# Altium PCB BOB_PAC5527.PcbDoc (part 1 of 3)
Units mm, origin at the board's own origin, x right, y up, seen from the top; angles counter-clockwise.
Board outline 40 x 40 mm, 2 copper layers (Top Layer, Bottom Layer), stack 1.448 mm thick; 84 components, 61 nets, 272 pads, 317 vias.
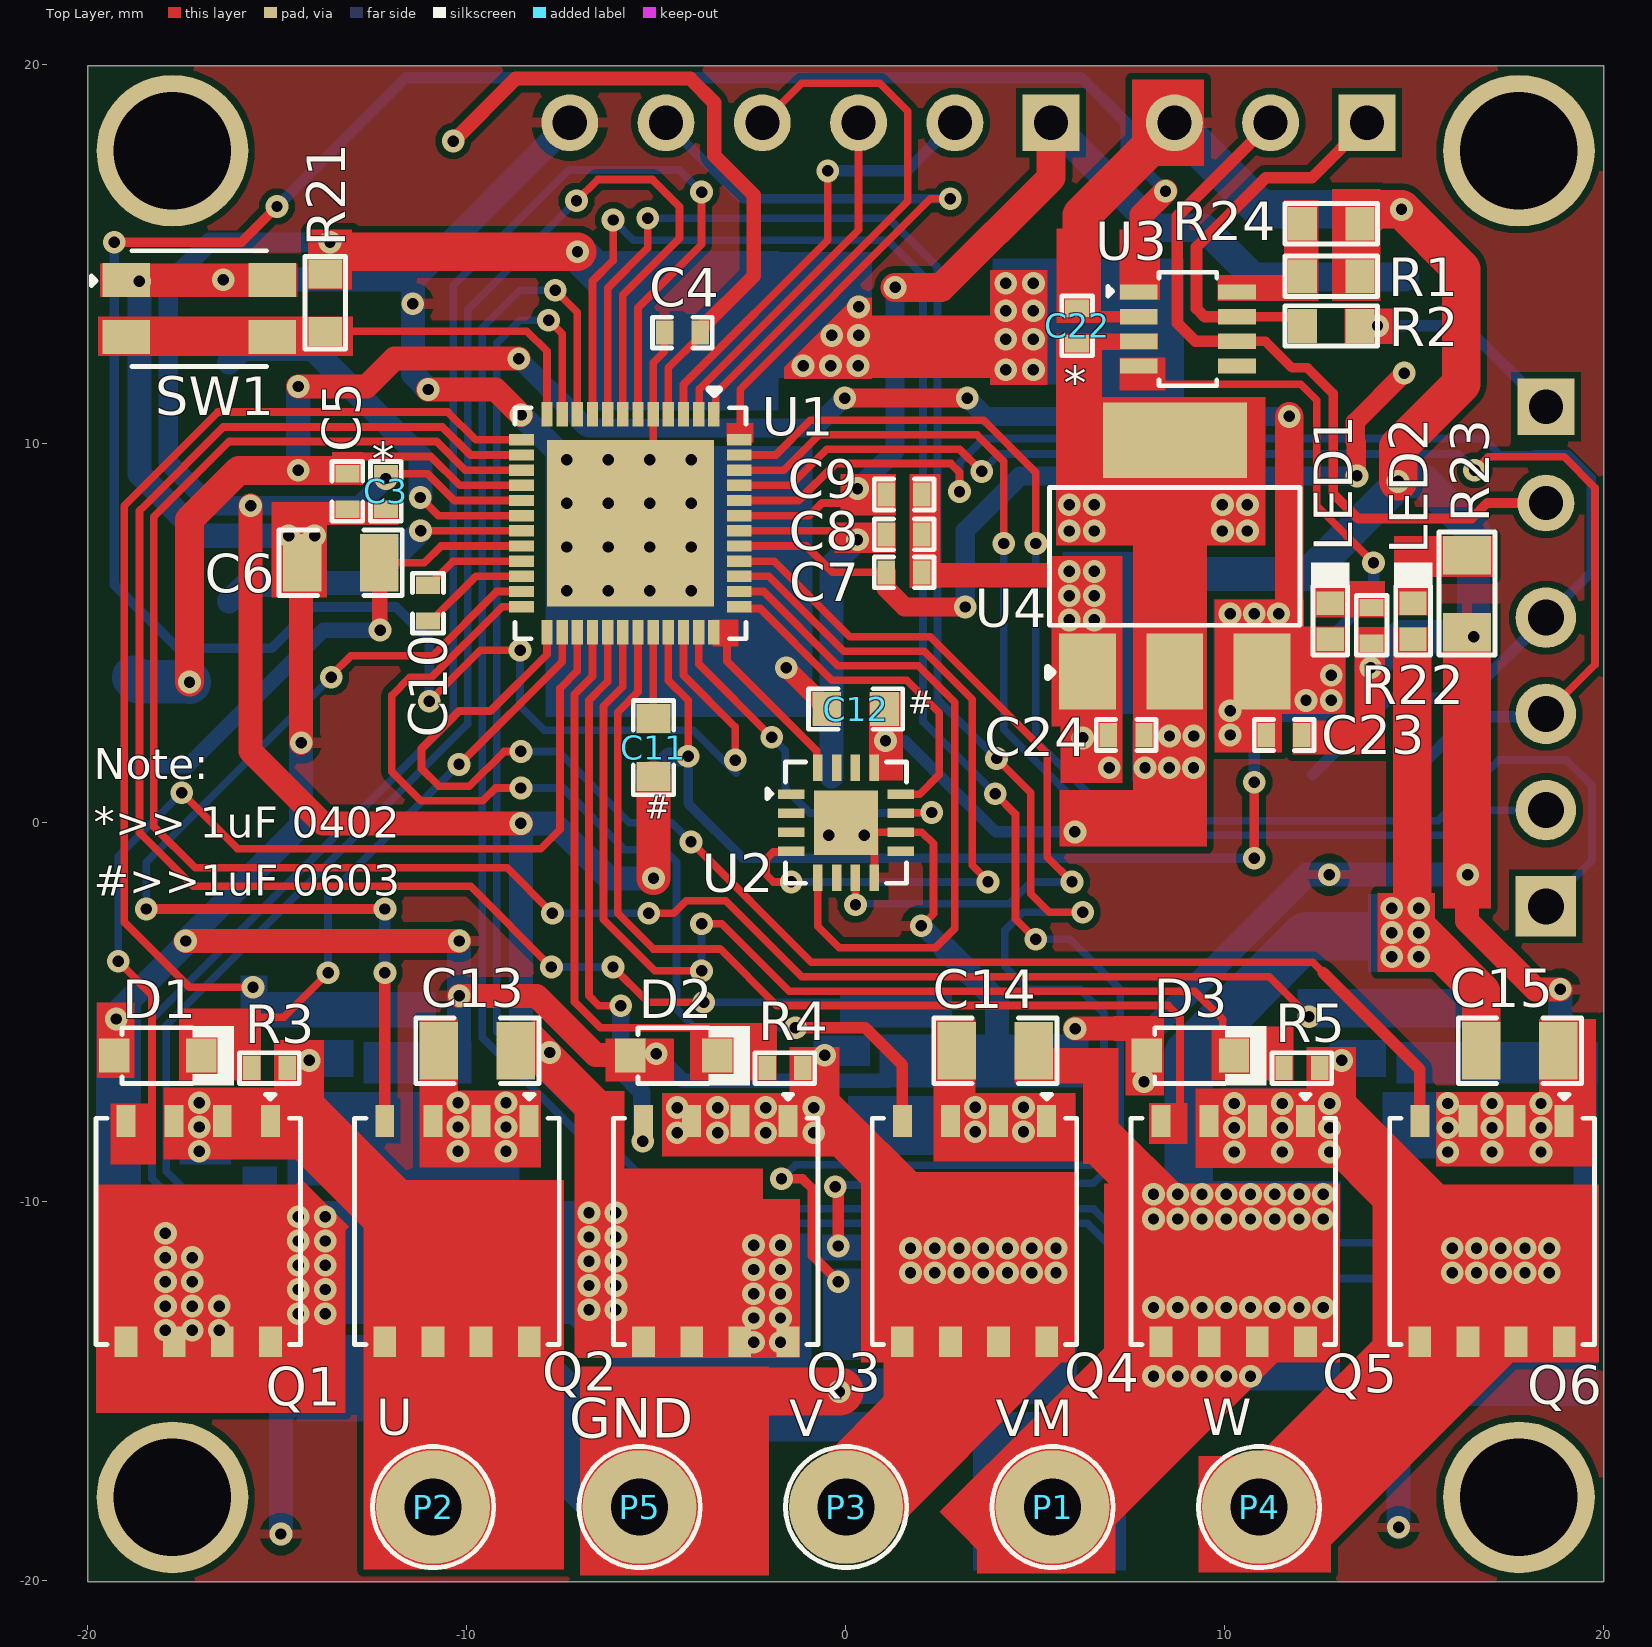
[diagram p0: Top Layer view]
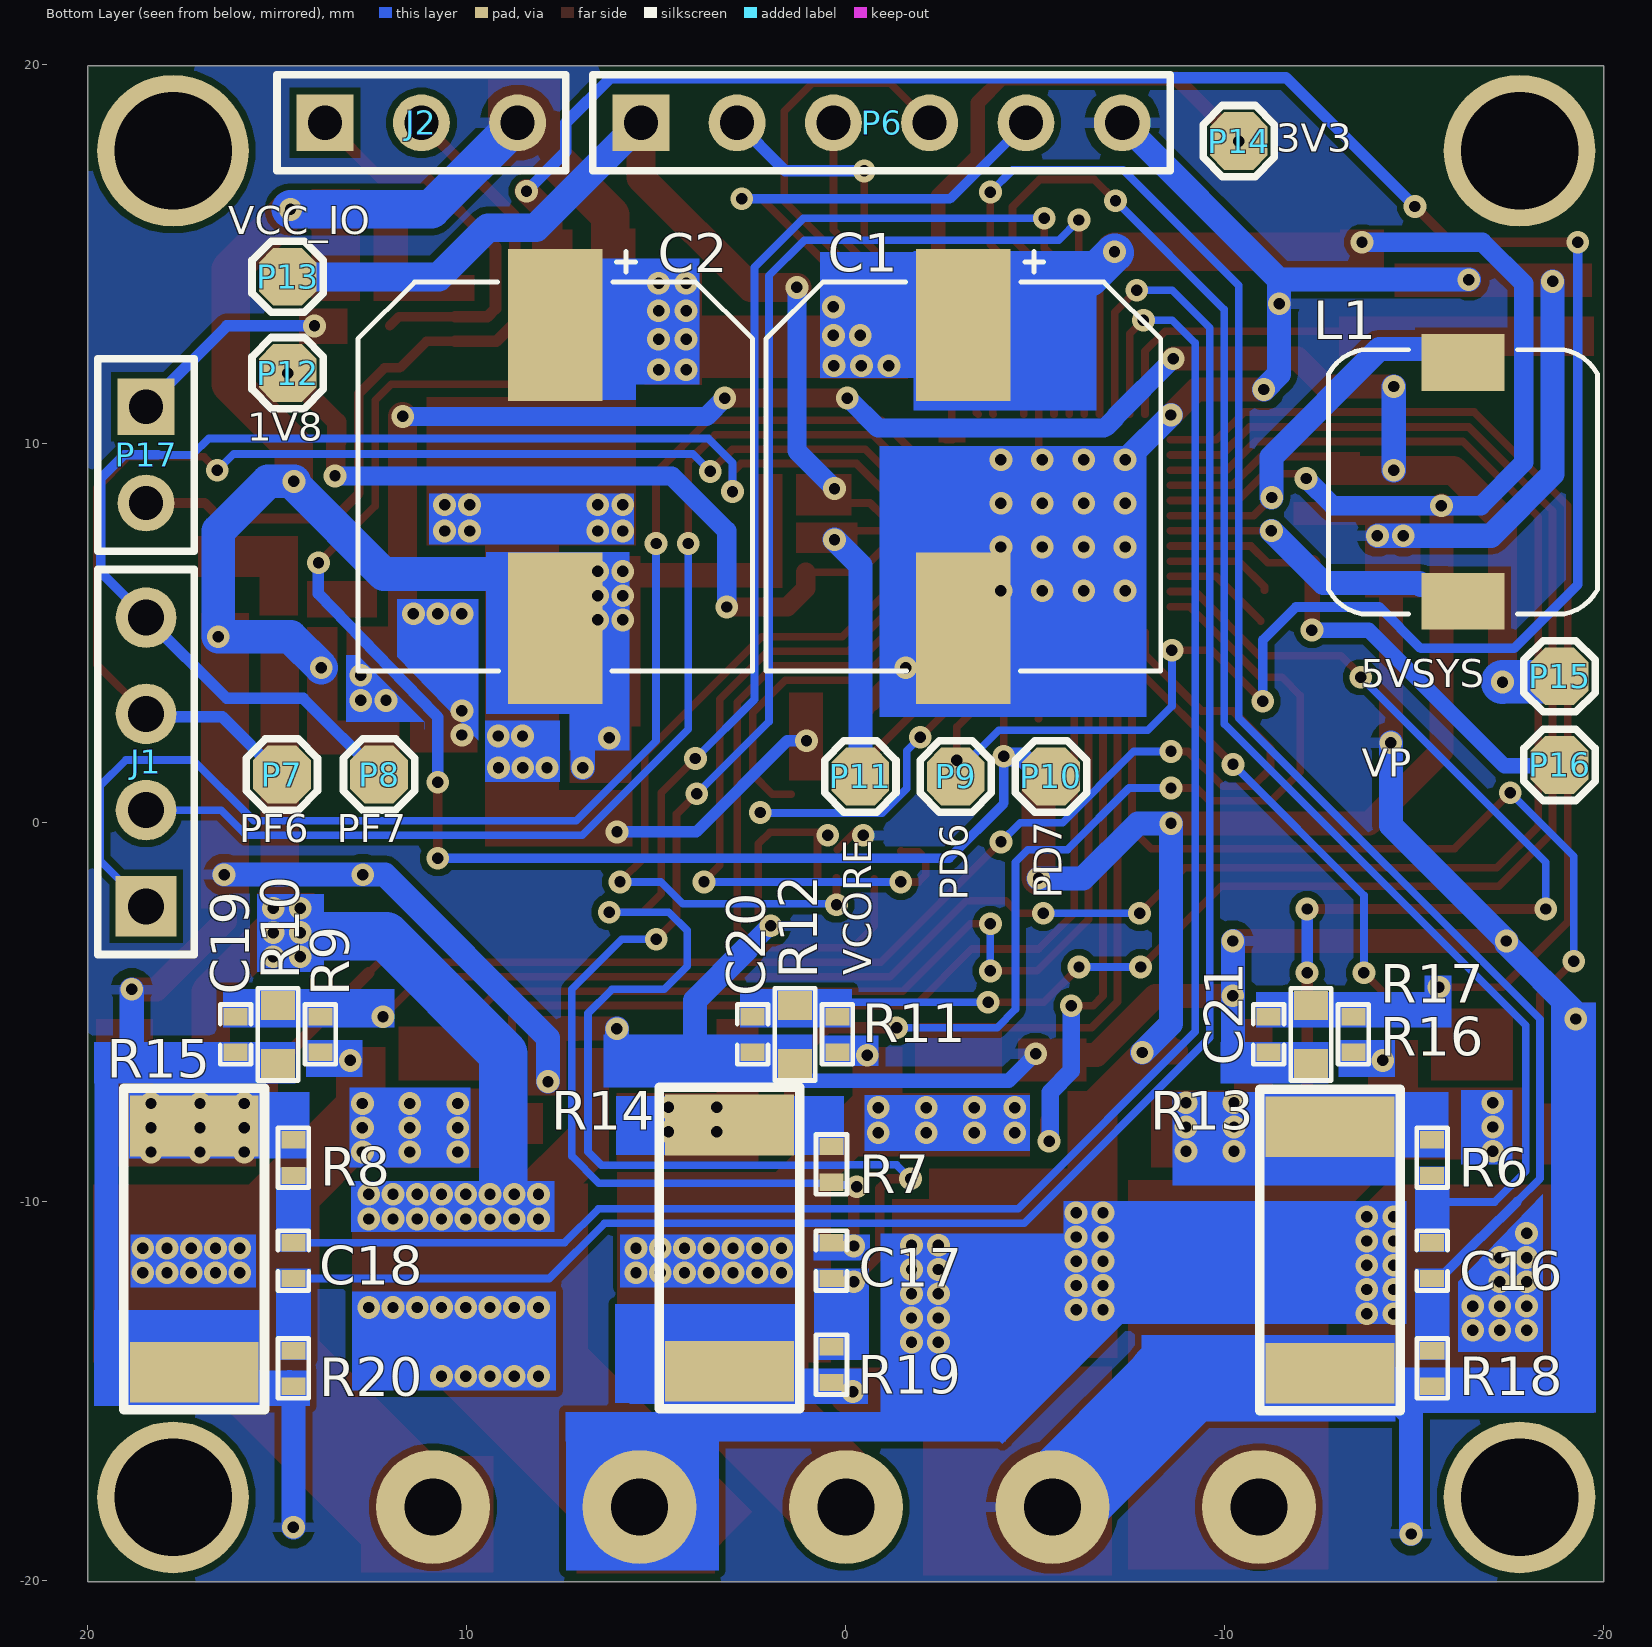
[diagram p1: Bottom Layer view, seen from below]
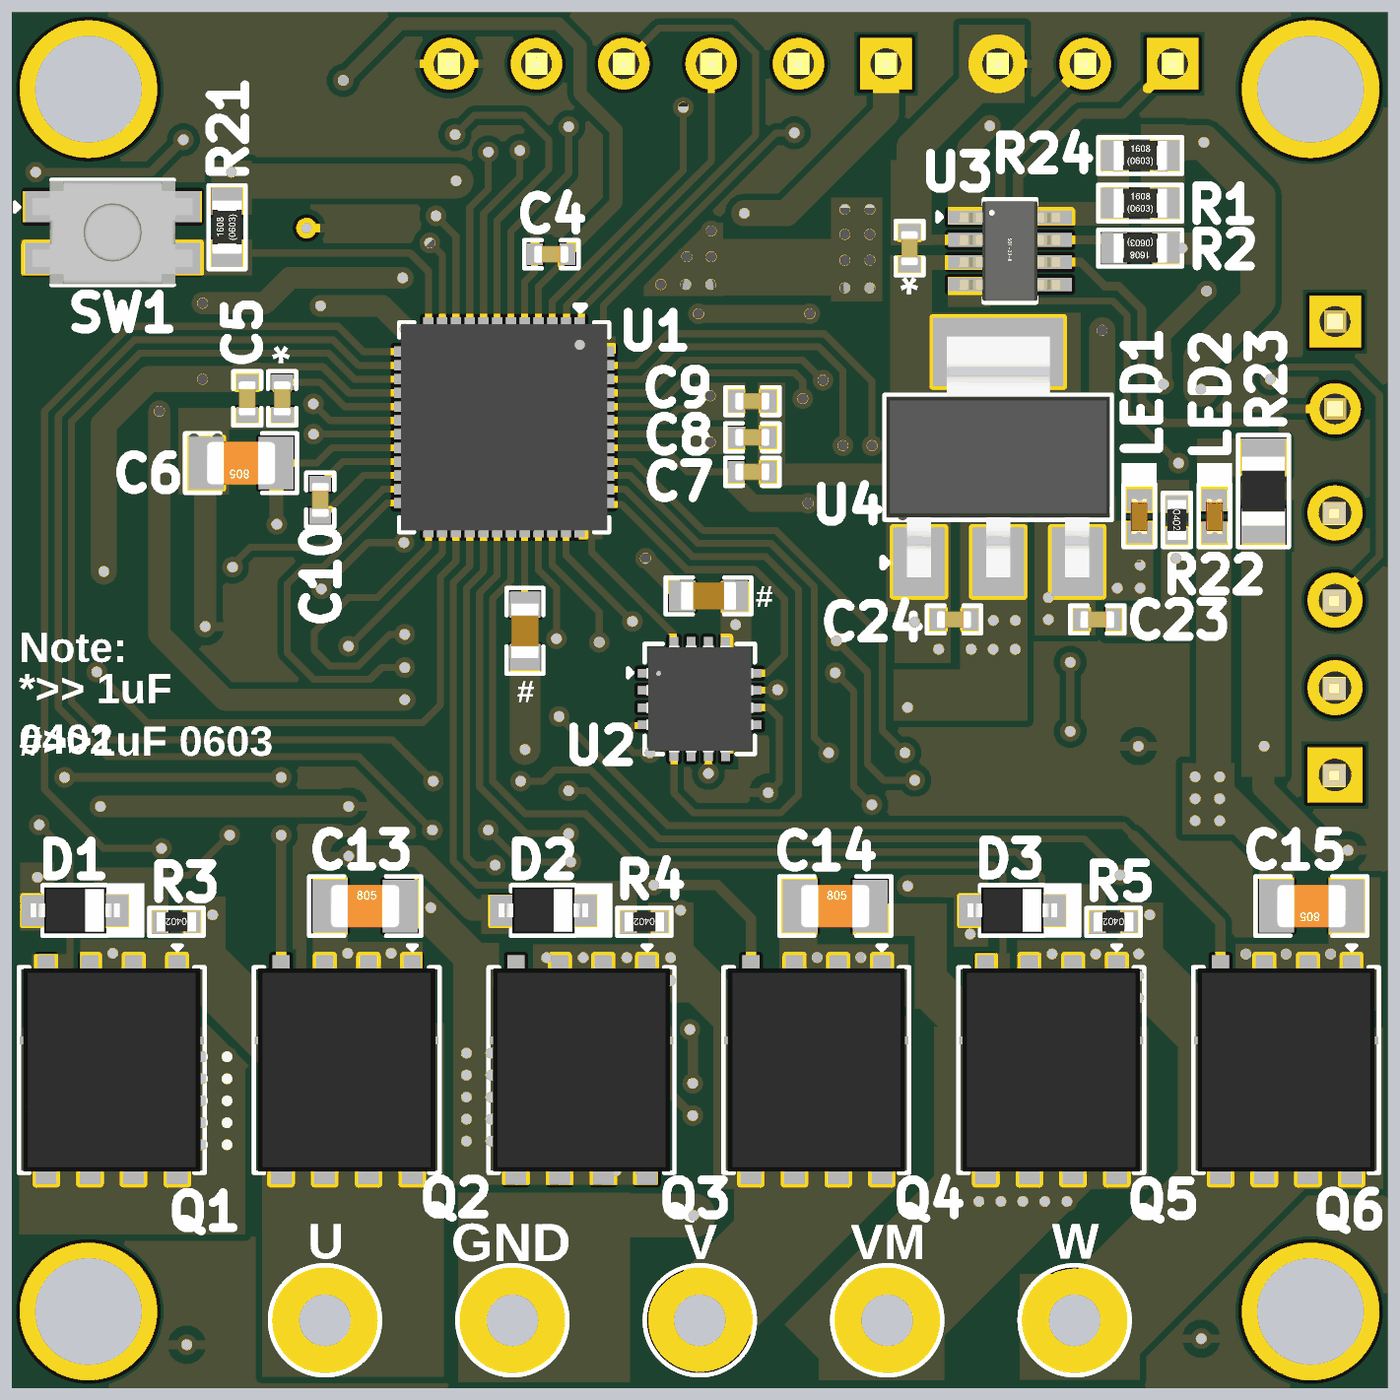
[diagram p3: 3D render of the assembled board from above, using the file's embedded part models]
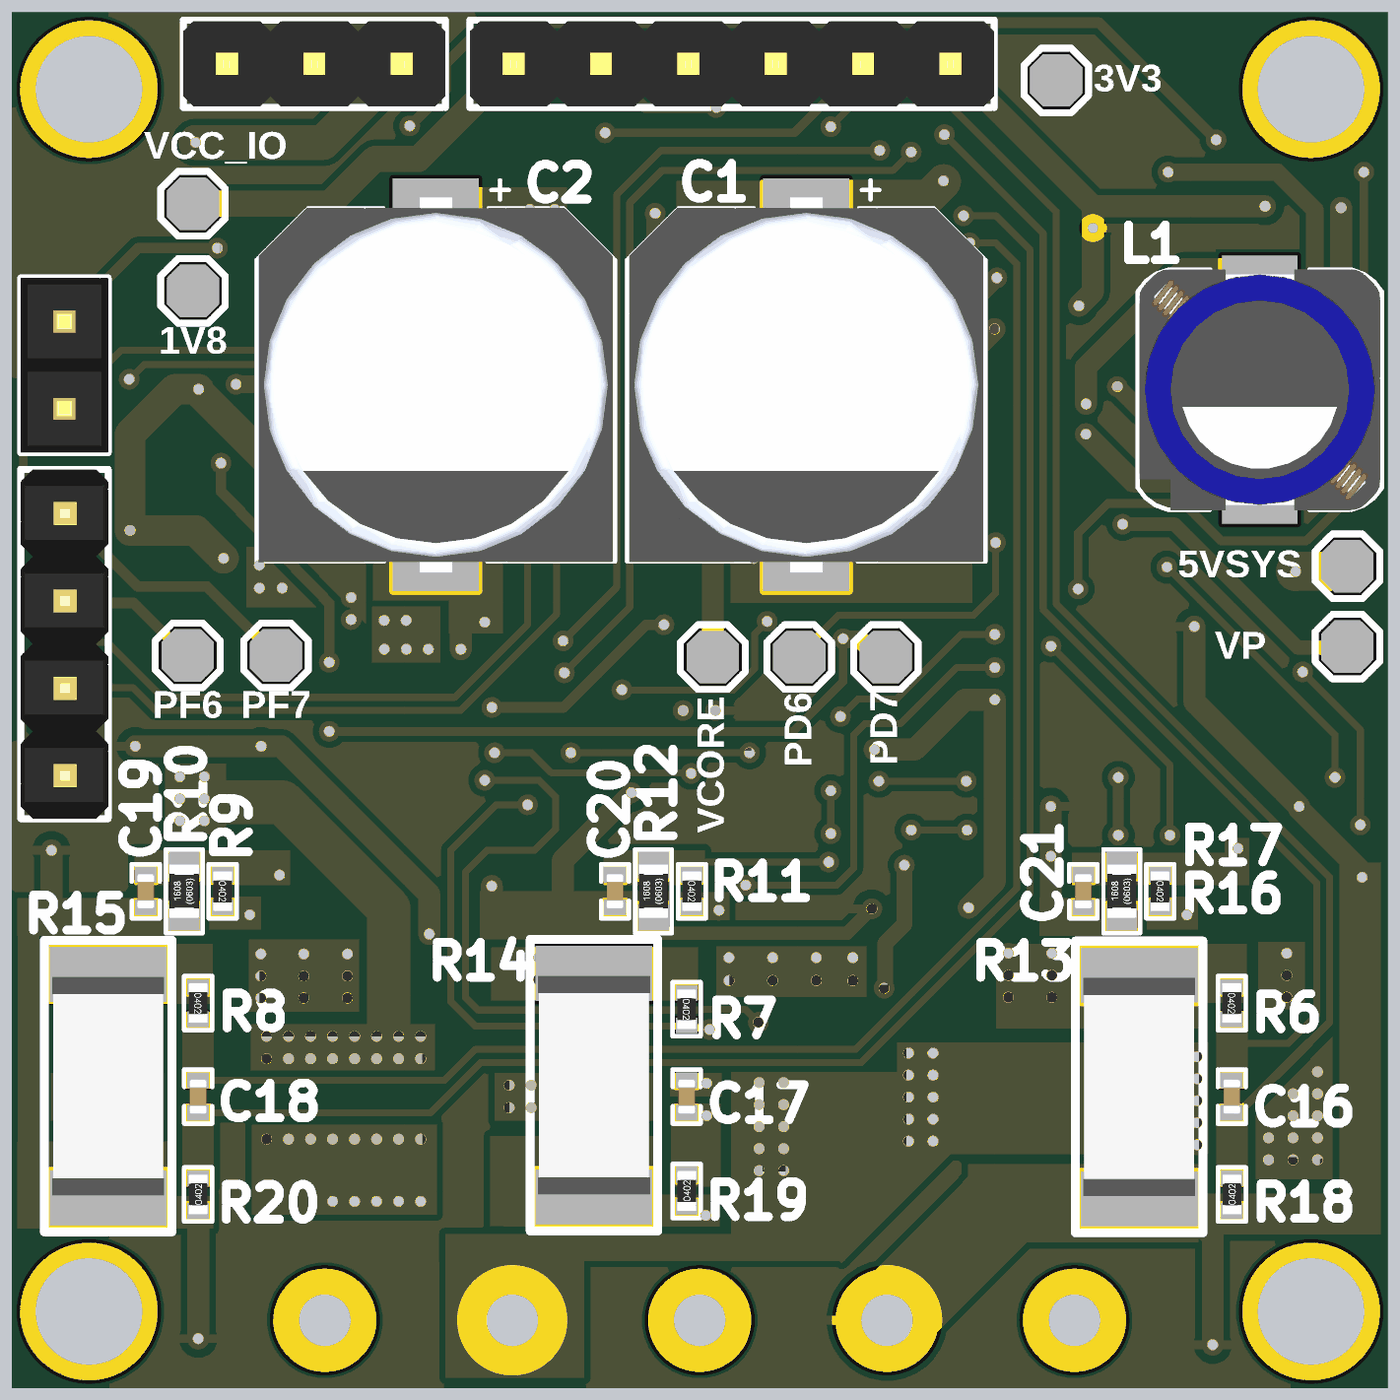
[diagram p4: 3D render of the assembled board from below, using the file's embedded part models]

## Layer stack, top to bottom
Top Solder: solder mask 0.0762, Solder Resist, Dk 3.5
Top Layer: signal copper 0.254
Dielectric 1: dielectric 0.9398, FR-4, Dk 4.8
Bottom Layer: signal copper 0.254
Bottom Solder: solder mask 0.0762, Solder Resist, Dk 3.5

## Board outline
-20,-20.036 -20,19.964 20,19.964 20,-20.036

## Design rules (kind name [scope] priority, off if disabled: settings)
Clearance [All] p1: gap=0.178 ignorepadtopadclearanceinfootprint=FALSE except(0: Arc-Hole Track-Hole SMDPad-Hole THPad-Hole Via-Hole Fill-Hole Poly-Hole Region-Hole Text-Hole; 0.097: Arc-SMDPad Track-SMDPad SMDPad-SMDPad)
HoleSize [All] p1: absolutevalues=TRUE maxlimit=25.4 minlimit=0.025 maxpercent=80.000 minpercent=20.000
HoleToHoleClearance [All] p1: gap=0 allowstackedmicrovias=TRUE
MinimumSolderMaskSliver [All] p1: minsoldermaskwidth=0
PolygonConnect [All] p1: connectstyle=Relief reliefconductorwidth=0.254 reliefentries=2 polygonreliefangle="90 Angle" airgapwidth=0.254
RoutingVias [All] p1: holewidth=0.3 width=0.6 viastyle="Through Hole" minholewidth=0.3 minwidth=0.6 maxholewidth=0.3 maxwidth=0.6
SilkToSilkClearance [All] p1: silktosilkclearance=0
SilkToSolderMaskClearance [IsPad] p1: minsilkscreentomaskgap=0 clearancetoexposedcopper=TRUE
SolderMaskExpansion [All] p1: expansion=0.102 istentingtop=FALSE
Width [All] p1: maxlimit=2.54 minlimit=0.203 preferedwidth=0.305 minimp=50.000000 maximp=50.000000 favimp=50.000000
25 further rules are at their usual default settings.

## Classes and differential pairs
component class U_Transistors: C13 C14 C15 C16 C17 C18 C19 C20 C21 D1 D2 D3 Q1 Q2 Q3 Q4 Q5 Q6 R3 R4 R5 R6 R7 R8 R9 R10 R11 R12 R13 R14 R15 R16 R17 R18 R19 R20
component class U_Power: C23 C24 P1 P2 P3 P4 P5 SW1 U4
component class U_LED_Indicator: LED1 LED2 R22 R23
component class U_Encoder: C12 U2
component class U_Driver: C1 C2 C3 C4 C5 C6 C7 C8 C9 C10 C11 L1 P7 P8 P9 P10 P11 P12 P13 P14 P15 P16 R21 U1
component class U_Communication: J1 J2 P6
component class U_CAN_TRANSCEIVER: C22 P17 R1 R2 R24 U3

## Components (designator, comment, footprint, x,y, rotation, side; value= is the part's Value field where it differs from the comment)
C1 "220uF" UCD-220uF-10mmDia -3.097,9.131 r270 bottom locked
C2 "220uF" UCD-220uF-10mmDia 7.673,9.131 r270 bottom locked
C3 "0.1uF" Cap-0402 -12.139,8.738 r270 top locked
C4 "2.2uF" Cap-0402 -4.316,12.929 r180 top locked
C5 "4.7uF" Cap-0402 -13.155,8.738 r270 top locked
C6 "22uF" Cap-0805 -13.333,6.858 r180 top locked
C7 "2.2uF" Cap-0402 1.531,6.604 r0 top locked
C8 "2.2uF" Cap-0402 1.531,7.606 r0 top locked
C9 "2.2uF" Cap-0402 1.531,8.658 r0 top locked
C10 "0.1uF" Cap-0402 -11.03,5.791 r270 top locked
C11 "1uF" Cap-0603 -5.08,1.981 r270 top locked
C12 "1uF" Cap-0603 0.254,2.997 r180 top locked
C13 "4.7uF" Cap-0805 -9.726,-6.02 r0 top locked
C14 "4.7uF" Cap-0805 3.939,-6.02 r0 top locked
C15 "4.7uF" Cap-0805 17.782,-6.02 r180 top locked
C16 "3.3nF" Cap-0402 -15.467,-11.557 r90 bottom locked
C17 "3.3nF" Cap-0402 0.381,-11.557 r90 bottom
C18 "3.3nF" Cap-0402 14.582,-11.557 r90 bottom locked
C19 "1000pF" Cap-0402 16.104,-5.588 r90 bottom locked
C20 "1000pF" Cap-0402 2.464,-5.588 r90 bottom locked
C21 "1000pF" Cap-0402 -11.151,-5.588 r90 bottom locked
C22 "0.1uF" Cap-0402 6.098,13.106 r90 top locked
C23 "10uF" Cap-0402 11.557,2.311 r0 top locked
C24 "10uF" Cap-0402 7.391,2.311 r180 top locked
D1 "1N4148WS-7-F" SOD-323 -18.159,-6.147 r180 top locked
D2 "1N4148WS-7-F" SOD-323 -4.545,-6.147 r180 top locked
D3 "1N4148WS-7-F" SOD-323 9.088,-6.147 r180 top locked
J1 "4Pin\2.54mm" HDR1X4_ 18.468,-2.21 r90 bottom locked
J2 "3Pin\2.54mm" HDR1X3_ 13.743,18.466 r180 bottom locked
L1 "22uH" "SLF7045T- 220MR90-PF" -16.279,8.992 r270 bottom locked
LED1 "Green" LED-0402 12.778,5.309 r90 top locked
LED2 "Green" LED-0402 14.963,5.309 r90 top locked
P1 "Through_Hole_Pad" "Through Hole Pad (High Power)_" 5.45,-18.059 r0 top locked
P2 "Through_Hole_Pad" "Through Hole Pad (High Power)_" -10.895,-18.059 r0 top locked
P3 "Through_Hole_Pad" "Through Hole Pad (High Power)_" 0.002,-18.059 r0 top locked
P4 "Through_Hole_Pad" "Through Hole Pad (High Power)_" 10.899,-18.059 r0 top locked
P5 "Through_Hole_Pad" "Through Hole Pad (High Power)_" -5.446,-18.059 r0 top locked
P6 "61300611121" HDR1X6_ 5.412,18.466 r180 bottom locked
P7 "TEST POINT" Test-point 14.884,1.27 r0 bottom locked
P8 "TEST POINT" Test-point 12.319,1.27 r0 bottom locked
P9 "TEST POINT" Test-point -2.894,1.219 r270 bottom locked
P10 "TEST POINT" Test-point -5.408,1.219 r180 bottom locked
P11 "TEST POINT" Test-point -0.379,1.219 r0 bottom locked
P12 "TEST POINT" Test-point 14.732,11.862 r270 bottom locked
P13 "TEST POINT" Test-point 14.732,14.402 r0 bottom locked
P14 "TEST POINT" Test-point -10.363,17.983 r180 bottom locked
P15 "TEST POINT" Test-point -18.827,3.861 r270 bottom locked
P16 "TEST POINT" Test-point -18.827,1.524 r180 bottom locked
P17 "61300211121" HDR1X2_ 18.468,10.973 r270 bottom locked
Q1 "BSC0702LS" PG-TDSON-8 -17.092,-10.786 r270 top locked
Q2 "BSC0702LS" PG-TDSON-8 -10.265,-10.786 r270 top locked
Q3 "BSC0702LS" PG-TDSON-8 -3.437,-10.786 r270 top locked
Q4 "BSC0702LS" PG-TDSON-8 3.39,-10.786 r270 top locked
Q5 "BSC0702LS" PG-TDSON-8 10.218,-10.786 r270 top locked
Q6 "BSC0702LS" PG-TDSON-8 17.045,-10.786 r270 top locked
R1 "100K" RES-0603 12.804,14.414 r180 top locked
R2 "120R" Res-0603 12.804,13.106 r0 top locked
R3 "1R" Res-0402 -15.213,-6.477 r180 top locked
R4 "1R" Res-0402 -1.611,-6.477 r180 top locked
R5 "1R" Res-0402 12.029,-6.477 r180 top locked
R6 "100R" Res-0402 -15.467,-8.839 r270 bottom locked
R7 "100R" Res-0402 0.383,-9.017 r270 bottom locked
R8 "100R" Res-0402 14.582,-8.839 r270 bottom locked
R9 "100K" Res-0402 13.868,-5.588 r270 bottom locked
R10 "4.3k" Res-0603 14.986,-5.588 r270 bottom locked
R11 "100K" Res-0402 0.229,-5.588 r270 bottom locked
R12 "4.3k" Res-0603 1.346,-5.588 r270 bottom locked
R13 "2m" RES-2512 -12.774,-11.278 r270 bottom locked
R14 "2m" RES-2512 3.075,-11.228 r270 bottom locked
R15 "2m" RES-2512 17.198,-11.253 r270 bottom locked
R16 "100K" Res-0402 -13.386,-5.588 r270 bottom locked
R17 "4.3k" Res-0603 -12.268,-5.588 r270 bottom locked
R18 "100R" Res-0402 -15.469,-14.402 r90 bottom locked
R19 "100R" Res-0402 0.381,-14.3 r90 bottom
R20 "100R" Res-0402 14.582,-14.402 r90 bottom locked
R21 "200K" Res-0603 -13.739,13.716 r270 top locked
R22 "1K" Res-0402 13.87,5.207 r270 top locked value=1kR
R23 "4.7k" RES-0805 16.385,6.045 r270 top locked
R24 "0R" Res-0603 12.804,15.799 r180 top locked
SW1 "TS-1185EC-C-D-B" TS-1185EC-C-D-B_ -17.067,13.564 r0 top locked
U1 "PAC5527QMST" "48-QFN (6x6)_" -5.688,7.899 r270 top locked
U2 "MA702GQ-Z" "16-QFN (3x3)." 0,0 r0 top locked
U3 "MAX3051EKA+T" SOT-23-8 9.019,13.025 r0 top locked
U4 "AZ1117CH-3.3TRG1" "SOT- 223" 8.675,7.038 r0 top locked

## Footprints (in the part's own frame and the unit in brackets; to place one, negate y for a bottom-side part, rotate by r counter-clockwise, add the part's x,y. Pads: shape width x height; smd on the part's side, far side on the other; paste and mask are expansions set on the pad)
"16-QFN (3x3)." [mm]
  rect 0.7x0.25 smd: 1(-1.45,0.75) 2(-1.45,0.25) 3(-1.45,-0.25) 4(-1.45,-0.75) 9(1.45,-0.75) 10(1.45,-0.25) 11(1.45,0.25) 12(1.45,0.75)
  rect 0.25x0.7 smd: 5(-0.75,-1.45) 6(-0.25,-1.45) 7(0.25,-1.45) 8(0.75,-1.45) 13(0.75,1.45) 14(0.25,1.45) 15(-0.25,1.45) 16(-0.75,1.45)
  rect 1.7x1.7 smd: 17(0,0)
  silkscreen extent -2.08,-1.6 1.6,1.6, body extent -1.55,-1.55 1.55,1.55, height 0.99
"48-QFN (6x6)_" [mm]
  rect 0.65x0.3 smd: 1(-2.875,2.2) 2(-2.875,1.8) 3(-2.875,1.4) 4(-2.875,1) 5(-2.875,0.6) 6(-2.875,0.2) 7(-2.875,-0.2) 8(-2.875,-0.6) 9(-2.875,-1) 10(-2.875,-1.4) 11(-2.875,-1.8) 12(-2.875,-2.2) 25(2.875,-2.2) 26(2.875,-1.8) 27(2.875,-1.4) 28(2.875,-1) 29(2.875,-0.6) 30(2.875,-0.2) 31(2.875,0.2) 32(2.875,0.6) 33(2.875,1) 34(2.875,1.4) 35(2.875,1.8) 36(2.875,2.2)
  rect 0.3x0.65 smd: 13(-2.2,-2.875) 14(-1.8,-2.875) 15(-1.4,-2.875) 16(-1,-2.875) 17(-0.6,-2.875) 18(-0.2,-2.875) 19(0.2,-2.875) 20(0.6,-2.875) 21(1,-2.875) 22(1.4,-2.875) 23(1.8,-2.875) 24(2.2,-2.875) 37(2.2,2.875) 38(1.8,2.875) 39(1.4,2.875) 40(1,2.875) 41(0.6,2.875) 42(0.2,2.875) 43(-0.2,2.875) 44(-0.6,2.875) 45(-1,2.875) 46(-1.4,2.875) 47(-1.8,2.875) 48(-2.2,2.875)
  rect 4.4x4.4 smd: 49(0,0)
  silkscreen extent -3.53,-3.05 3.05,3.05, body extent -3,-3 3,3, height 0.86
Cap-0402 [mil]
  rect 18x25 smd mask+2.36: 1(-18.5,0) 2(18.5,0)
  silkscreen extent -31,-16 31,16, body extent -20,-10 20,10, height 19
Cap-0603 [mil]
  rect 30x35 smd mask+2.36: 1(-30,0) 2(30,0)
  silkscreen extent -49,-21 49,21, body extent -32,-16 31,16, height 34
Cap-0805 [mil] "SMD 0805"
  rect 40x60 smd mask+2.76: 1(-40,0) 2(40,0)
  silkscreen extent -64,-34 64,34, body extent -39,-25 39,25, height 30
HDR1X2_ [mm] "CONN HEADER VERT 2POS 2.54MM"
  rect 1.5x1.5 hole 0.9: 1(0,0)
  round 1.5 hole 0.9: 2(2.54,0)
  silkscreen extent -1.27,-1.27 3.81,1.27, body extent -1.27,-1.27 3.81,1.27, height 8.44
HDR1X3_ [mm] "Connector; Header; 3 Position"
  rect 1.5x1.5 hole 0.9: 1(0,0)
  round 1.5 hole 0.9: 2(2.54,0) 3(5.08,0)
  silkscreen extent -1.27,-1.27 6.35,1.27, body extent -1.27,-1.24 6.35,1.25, height 8.54
HDR1X4_ [mm] "Connector; Header; 4 Position"
  rect 1.6x1.6 hole 0.95: 1(0,0)
  round 1.6 hole 0.95: 2(2.54,0) 3(5.08,0) 4(7.62,0)
  silkscreen extent -1.27,-1.27 8.89,1.27, body extent -1.27,-1.27 8.89,1.27, height 9.5
HDR1X6_ [mm] "Connector; Header; 6 Position"
  rect 1.5x1.5 hole 0.9: 1(0,0)
  round 1.5 hole 0.9: 2(2.54,0) 3(5.08,0) 4(7.62,0) 5(10.16,0) 6(12.7,0)
  silkscreen extent -1.27,-1.27 13.97,1.27, body extent -1.27,-1.24 13.97,1.25, height 8.54
LED-0402 [mm]
  rect 0.62x0.72 smd: 1(-0.475,0) 2(0.475,0)
  silkscreen extent -0.89,-0.51 1.55,0.51, body extent -0.5,-0.25 0.51,0.25, height 0.45
PG-TDSON-8 [mm]
  rect 0.85x0.5 smd: 1(-2.912,1.905) 2(-2.912,0.635) 3(-2.912,-0.635) 4(-2.912,-1.905)
  rect 0.8x0.6 smd: 5(2.913,-1.905) 6(2.913,-0.635) 7(2.913,0.635) 8(2.913,1.905)
  Top Layer region: -0.838,2.205 -0.838,-2.205 2.552,-2.205 2.552,2.205
  silkscreen extent -3.62,-2.7 2.99,2.7, body extent -3.08,-2.68 3.08,2.68, height 1
Res-0402 [mil]
  rect 18x25 smd mask+2.17: 1(-18.5,0) 2(18.5,0)
  silkscreen extent -32,-17 32,16, body extent -23,-11 23,11, height 16
RES-0603 [mil]
  rect 30x35 smd: 1(-30,0) 2(30,0)
  silkscreen extent -48,-21 48,21, body extent -31,-17 31,17, height 18
Res-0603 [mil]
  rect 30x35 smd: 1(-30,0) 2(30,0)
  silkscreen extent -48,-21 48,21, body extent -31,-17 31,17, height 18
RES-0805 [mil] "SMD 0805"
  rect 40x50 smd: 1(-40,0) 2(40,0)
  silkscreen extent -64,-29 64,29, body extent -39,-25 39,24, height 24
RES-2512 [mm]
  rect 1.6x3.4 smd: 1(-3.25,0) 2(3.25,0)
  silkscreen extent -4.24,-1.85 4.24,1.85, body extent -3.17,-1.63 3.18,1.63, height 0.58
"SLF7045T- 220MR90-PF" [mm]
  rect 1.5x2.2 smd: 1(-3.15,0) 2(3.15,0)
  silkscreen extent -3.49,-3.55 3.49,3.55, body extent -3.5,-3.5 3.5,3.5, height 4.8
SOD-323 [mm]
  rect 0.8x0.9 smd mask+0.055: 1(-1.15,0) 2(1.15,0)
  silkscreen extent -2.01,-0.79 0.94,0.79, body extent -1.3,-0.67 1.3,0.67, height 1.1
SOT-23-8 [mm]
  rect 1x0.4 smd: 1(-1.295,0.975) 2(-1.295,0.325) 3(-1.295,-0.325) 4(-1.295,-0.975) 5(1.295,-0.975) 6(1.295,-0.325) 7(1.295,0.325) 8(1.295,0.975)
  silkscreen extent -2.11,-1.5 0.76,1.5, body extent -1.48,-1.45 1.48,1.45, height 1.1
"SOT- 223" [mm]
  rect 1.5x2 smd: 1(-2.3,-3.05) 2(0,-3.05) 3(2.3,-3.05)
  rect 3.8x2 smd: 4(0,3.05)
  silkscreen extent -3.35,-3.2 3.3,1.8, body extent -3.25,-3.5 3.25,3.5, height 1.61
Test-point [mil]
  oct 60x60 smd: 1(0,0)
  silkscreen extent -37,-37 37,37
"Through Hole Pad (High Power)_" [mm]
  round 3 hole 1.5: 1(0,0)
  silkscreen extent -1.6,-1.6 1.6,1.6
TS-1185EC-C-D-B_ [mm]
  rect 1.25x0.9 smd: 1(-1.925,0.75) 1(1.925,0.75) 2(-1.925,-0.75) 2(1.925,-0.75)
  silkscreen extent -2.84,-1.52 1.78,1.52, body extent -2.33,-1.5 2.32,1.5, height 2
UCD-220uF-10mmDia [mm] "0.406\" L x 0.406\" W (10.30mm x 10.30mm)"
  rect 4x2.5 smd: 1(-4,0) 2(4,0)
  silkscreen extent -5.95,-5.21 5.13,5.21, body extent -5.45,-5.15 5.45,5.15, height 10.8

## Part data
C1 C2: library part UCD1H221MNL1GS, "CAP ALUM 220UF 20% 50V SMD", Case/Package=Radial, LCSC Part Number=C116211, Leakage Current=3uA, Manufacturer=Nichicon, Max Operating Temperature=105°C, Min Operating Temperature=-55°C, Package Quantity=1, Ripple Current=700mA, Supplier Part Number 1=493-6390-1-ND, Tolerance=20%, Voltage=50V, Capacitance=220uF, Category="Aluminum Electrolytic Capacitors", ComponentLink1Description=https://datasheet.ciiva.com/11776/0900766b80ebdadd-11776792.pdf?src-supplier=RSComponents, ComponentLink1URL=https://datasheet.ciiva.com/11776/0900766b80ebdadd-11776792.pdf?src-supplier=RSComponents, ComponentLink2Description=https://datasheet.ciiva.com/5362/e-cd-22158-5362489.pdf?src-supplier=Mouser, ComponentLink2URL=https://datasheet.ciiva.com/5362/e-cd-22158-5362489.pdf?src-supplier=Mouser, ComponentLink3Description=https://datasheet.ciiva.com/11684/e-cd-11684678.pdf?src-supplier=Avnet, ComponentLink3URL=https://datasheet.ciiva.com/11684/e-cd-11684678.pdf?src-supplier=Avnet, ComponentLink4Description=https://datasheet.ciiva.com/15037/e-cd-15037119.pdf?src-supplier=Digi-Key, ComponentLink4URL=https://datasheet.ciiva.com/15037/e-cd-15037119.pdf?src-supplier=Digi-Key, ComponentLink5Description=https://datasheet.ciiva.com/16393/e-cd-16393493.pdf?src-supplier=Future+Electronics, ComponentLink5URL=https://datasheet.ciiva.com/16393/e-cd-16393493.pdf?src-supplier=Future+Electronics, ComponentLink6Description=https://datasheet.ciiva.com/17354/e-cd-17354606.pdf?src-supplier=Avnet+Europe, ComponentLink6URL=https://datasheet.ciiva.com/17354/e-cd-17354606.pdf?src-supplier=Avnet+Europe, Construction=Cylindrical, Diameter=10mm, Dissipation Factor=0.1%, Features="General Purpose", Height=10mm, Height - Seated (Max)=0.394inch, Impedance=160mR, Lead Free="Lead Free", Length=10mm, Life (Hours)=5000Hour, Manufacturer Part Number=UCD1H221MNL1GS, Mount="Surface Mount,PCB", Packaging="Tape and Reel", Pricing 1="1=0.85000, 10=0.60200, 50=0.45480, 100=0.39620 (USD)", Radiation Hardening=No, RoHS=Yes, RoHS Compliant=Yes, Series=CD, Supplier 1=Digi-Key, Termination=SMD/SMT, Voltage Rating=50V, Voltage Rating (DC)=50V
C3 C10 C22: library part GRM155R62A104KE14D, "CAP CER 0.1UF 100V X5R 0402", Capacitance=100nF, Case Code (Imperial)=0402, Case Code (Metric)=1005, Dielectric=X5R, LCSC Part Number=C162178, Manufacturer=Murata, Max Operating Temperature=85°C, Min Operating Temperature=-55°C, Package Quantity=10000, Tolerance=10%, Voltage Rating=100V, Case/Package=0402, Category="Ceramic Capacitors", ComponentLink1Description=http://www.farnell.com/datasheets/2079151.pdf?src-supplier=Farnell, ComponentLink1URL=http://www.farnell.com/datasheets/2079151.pdf?src-supplier=Farnell, ComponentLink2Description=http://www.mouser.com/ds/2/281/c02e-2905.pdf?src-supplier=Mouser, ComponentLink2URL=http://www.mouser.com/ds/2/281/c02e-2905.pdf?src-supplier=Mouser, ComponentLink3Description=http://www.farnell.com/datasheets/2079151.pdf?src-supplier=Element14, ComponentLink3URL=http://www.farnell.com/datasheets/2079151.pdf?src-supplier=Element14, ComponentLink4Description=http://search.murata.co.jp/Ceramy/image/img/A01X/G101/ENG/GRM155R62A104KE14-01.pdf?src-supplier=Digi-Key, ComponentLink4URL=http://search.murata.co.jp/Ceramy/image/img/A01X/G101/ENG/GRM155R62A104KE14-01.pdf?src-supplier=Digi-Key, ComponentLink5Description=http://www.farnell.com/datasheets/2079151.pdf?src-supplier=Newark, ComponentLink5URL=http://www.farnell.com/datasheets/2079151.pdf?src-supplier=Newark, Height=0.5mm, Item Type=Capacitor, Lead Free="Lead Free", Length=0.039inch, Manufacturer Part Number=GRM155R62A104KE14D, Mount="Surface Mount", Packaging="Tape and Reel", Pricing 1="10000=0.00500, 20000=0.00410, 30000=0.00390, 50000=0.00370, 100000=0.00300 (USD)", Reach SVHC Compliant=Yes, RoHS=Yes, RoHS Compliant=Yes, Series=GRM, Stock 1=870000, Supplier 1="Arrow Electronics", Supplier Part Number 1=GRM155R62A104KE14D, Termination=SMD/SMT, Thickness=0.022inch, Voltage Rating (DC)=100V, Weight=0.000212oz, Width=0.02inch
C4 C7 C8 C9: library part GRM155R61E225KE11D, "CAP CER 2.2UF 25V X5R 0402", Case Code (Imperial)=0402, Case Code (Metric)=1005, Dielectric=X5R, LCSC Part Number=C385032, Manufacturer=Murata, Max Operating Temperature=85°C, Min Operating Temperature=-55°C, Package Quantity=10000, Resistor Type=Ceramic, Tolerance=10%, Voltage Rating=25V, Capacitance=2.2uF, Case/Package=0402, Category="Ceramic Capacitors", ComponentLink1Description=http://www.mouser.com/ds/2/281/c02e-2905.pdf?src-supplier=Mouser, ComponentLink1URL=http://www.mouser.com/ds/2/281/c02e-2905.pdf?src-supplier=Mouser, ComponentLink2Description=http://search.murata.co.jp/Ceramy/image/img/A01X/G101/ENG/GRM155R61E225KE11-01.pdf?src-supplier=Digi-Key, ComponentLink2URL=http://search.murata.co.jp/Ceramy/image/img/A01X/G101/ENG/GRM155R61E225KE11-01.pdf?src-supplier=Digi-Key, ComponentLink3Description=http://search.murata.co.jp/Ceramy/image/img/A01X/partnumbering_e_01.pdf?src-supplier=Digi-Key, ComponentLink3URL=http://search.murata.co.jp/Ceramy/image/img/A01X/partnumbering_e_01.pdf?src-supplier=Digi-Key, ComponentLink4Description=http://psearch.en.murata.com/capacitor/product/GRM155R61E225KE11%23.pdf?src-supplier=Avnet, ComponentLink4URL=http://psearch.en.murata.com/capacitor/product/GRM155R61E225KE11%23.pdf?src-supplier=Avnet, Height=0.5mm, Item Type=Capacitor, Lead Free="Lead Free", Length=1mm, Manufacturer Part Number=GRM155R61E225KE11D, Material=Ceramic, Mount="Surface Mount", Packaging="Tape and Reel", Pricing 1="10000=0.03830, 20000=0.03623, 40000=0.03416, 60000=0.03209, 80000=0.03002, 100000=0.02795, 1000000=0.02588 (USD)", RoHS=Yes, RoHS Compliant=Yes, Stock 1=210000, Supplier 1=Avnet, Supplier Part Number 1=GRM155R61E225KE11D, Termination=SMD/SMT, Thickness=0.022inch, Voltage Rating (DC)=25V, Weight=0.000212oz, Width=0.5mm
C5: library part EDK105BBJ475MVLF, "CAP CER 4.7UF 50V 0402", LCSC Part Number=C412302, Manufacturer="Taiyo Yuden", ComponentLink1Description=LCSC, ComponentLink1URL=https://www.lcsc.com/product-detail/Multilayer-Ceramic-Capacitors-MLCC-SMD-SMT_Taiyo-Yuden-EDK105BBJ475MVLF_C412302.html, Item Type=Capacitor, Manufacturer Part Number=EDK105BBJ475MVLF
C6: library part CL21A226MAYNNNE, "CAP CER 22UF 25V X5R 0805", LCSC Part Number=C602037, Manufacturer=Samsung, Supplier Part Number 1=187-CL21A226MAYNNNE, Category="Ceramic Capacitors", Manufacturer Part Number=CL21A226MAYNNNE, Pricing 1="1=0.28000, 10=0.18500, 50=0.18500, 100=0.10600, 500=0.07500, 1000=0.06400, 2000=0.06100, 10000=0.05400, 24000=0.05100, 50000=0.04600 (USD)", RoHS=Yes, RoHS Compliant=Yes, Stock 1=1240410, Supplier 1=Mouser
C11 C12: library part UMK107AB7105KA-T, "CAP CER 1UF 50V X7R 0603", Case Code (Imperial)=0603, Case Code (Metric)=1608, Dielectric=X7R, LCSC Part Number=C105174, Manufacturer="Taiyo Yuden", Max Operating Temperature=125°C, Min Operating Temperature=-55°C, Package Quantity=1, Supplier Part Number 1=587-3247-1-ND, Tolerance=10%, Voltage Rating=50V, Capacitance=1uF, Case/Package=0603, ComponentLink1Description=http://www.farnell.com/datasheets/2048165.pdf?src-supplier=Element14, ComponentLink1URL=http://www.farnell.com/datasheets/2048165.pdf?src-supplier=Element14, ComponentLink2Description=https://www.murata.com/~/media/webrenewal/support/library/catalog/products/capacitor/mlcc/c02e.ashx?la=en-us&src-supplier=Digi-Key, ComponentLink2URL=https://www.murata.com/~/media/webrenewal/support/library/catalog/products/capacitor/mlcc/c02e.ashx?la=en-us&src-supplier=Digi-Key, ComponentLink3Description=https://www.yuden.co.jp/productdata/catalog/mlcc_all_e.pdf?src-supplier=Digi-Key, ComponentLink3URL=https://www.yuden.co.jp/productdata/catalog/mlcc_all_e.pdf?src-supplier=Digi-Key, ComponentLink4Description=https://www.yuden.co.jp/productdata/catalog/mlcc_all_e.pdf?src-supplier=Onlinecomponents.com, ComponentLink4URL=https://www.yuden.co.jp/productdata/catalog/mlcc_all_e.pdf?src-supplier=Onlinecomponents.com, Depth=0.8mm, Halogen Free="Halogen Free", Height=0.8mm, Length=1.6mm, Manufacturer Part Number=UMK107AB7105KA-T, Mount="Surface Mount", Packaging="Tape and Reel", Pricing 1="1=0.28, 10=0.19, 100=0.1079, 500=0.0762, 1000=0.0667 (USD)", Radiation Hardening=No, Stock 1=453098, Supplier 1=Digi-Key, Termination=SMD/SMT, Thickness=0.037inch, Voltage Rating (DC)=50V, Width=0.031inch
C13 C14 C15: library part GRM21BR61H475KE51L, "CAP CER 4.7UF 50V X5R 0805", Case Code (Imperial)=0805, Case Code (Metric)=2012, Dielectric=X5R, LCSC Part Number=C162420, Manufacturer=Murata, Max Operating Temperature=85°C, Min Operating Temperature=-55°C, Supplier Part Number 1=1138707P, Tolerance=10%, Voltage Rating=50V, Capacitance=4.7uF, Case/Package=0805, Category="Ceramic Capacitors", ComponentLink1Description=http://www.farnell.com/datasheets/2079186.pdf?src-supplier=Farnell, ComponentLink1URL=http://www.farnell.com/datasheets/2079186.pdf?src-supplier=Farnell, ComponentLink2Description=http://components.arrow.com/part/dataview/61084395S454511N2606?src-supplier=Arrow+Electronics, ComponentLink2URL=http://components.arrow.com/part/dataview/61084395S454511N2606?src-supplier=Arrow+Electronics, ComponentLink3Description=http://www.farnell.com/datasheets/2079186.pdf?src-supplier=Element14, ComponentLink3URL=http://www.farnell.com/datasheets/2079186.pdf?src-supplier=Element14, ComponentLink4Description=http://search.murata.co.jp/Ceramy/image/img/A01X/G101/ENG/GRM21BR61H475KE51-01.pdf?src-supplier=Digi-Key, ComponentLink4URL=http://search.murata.co.jp/Ceramy/image/img/A01X/G101/ENG/GRM21BR61H475KE51-01.pdf?src-supplier=Digi-Key, ComponentLink5Description=https://search.murata.co.jp/Ceramy/image/img/A01X/G101/ENG/GRM21BR61H475KE51-01.pdf?src-supplier=Digi-Key, ComponentLink5URL=https://search.murata.co.jp/Ceramy/image/img/A01X/G101/ENG/GRM21BR61H475KE51-01.pdf?src-supplier=Digi-Key, ComponentLink6Description=http://www.farnell.com/datasheets/2079186.pdf?src-supplier=Newark, ComponentLink6URL=http://www.farnell.com/datasheets/2079186.pdf?src-supplier=Newark, Depth=1.25mm, Height=1.25mm, Item Type=Capacitor, Lead Free="Lead Free", Length=2mm, Manufacturer Part Number=GRM21BR61H475KE51L, Material=Ceramic, Mount="Surface Mount", Packaging="Tape and Reel", Pricing 1="500=0.09400, 1000=0.08800, 2000=0.08300, 5000=0.07500 (GBP)", Reach SVHC Compliant=Yes, RoHS=Yes, RoHS Compliant=Yes, Series=GRM, Stock 1=37300, Supplier 1=Rs, Thickness=0.055inch, Voltage Rating (DC)=50V, Width=0.049inch
C16 C17 C18: library part CC0402KRX7R9BB332, "CAP CER 3.3nF 50V X7R 0402", Case Code (Imperial)=0402, Case Code (Metric)=1005, Dielectric=X7R, Dielectric Material=Ceramic, Insulation Resistance=100GR, LCSC Part Number=C107028, Manufacturer=Yageo, Max Operating Temperature=125°C, Min Operating Temperature=-55°C, Package Quantity=1, Supplier Part Number 1=9776550, Tolerance=10%, Voltage=50V, Capacitance=3.3nF, Case/Package=0402, Category="Ceramic Capacitors", ComponentLink1Description=https://datasheet.ciiva.com/144/mlccorderingcode-144014.pdf?src-supplier=Digi-Key, ComponentLink1URL=https://datasheet.ciiva.com/144/mlccorderingcode-144014.pdf?src-supplier=Digi-Key, ComponentLink2Description=https://datasheet.ciiva.com/144/mlccorderingcode-144013.pdf?src-supplier=Digi-Key, ComponentLink2URL=https://datasheet.ciiva.com/144/mlccorderingcode-144013.pdf?src-supplier=Digi-Key, ComponentLink3Description=https://datasheet.ciiva.com/144/mlccorderingcode-144015.pdf?src-supplier=Digi-Key, ComponentLink3URL=https://datasheet.ciiva.com/144/mlccorderingcode-144015.pdf?src-supplier=Digi-Key, ComponentLink4Description=https://datasheet.ciiva.com/11786/0900766b80d84f1d-11786153.pdf?src-supplier=Rs, ComponentLink4URL=https://datasheet.ciiva.com/11786/0900766b80d84f1d-11786153.pdf?src-supplier=Rs, ComponentLink5Description=https://datasheet.ciiva.com/7978/1489800-7978103.pdf?src-supplier=Element14, ComponentLink5URL=https://datasheet.ciiva.com/7978/1489800-7978103.pdf?src-supplier=Element14, ComponentLink6Description=https://datasheet.ciiva.com/28450/1489800-28450409.pdf?src-supplier=Element14, ComponentLink6URL=https://datasheet.ciiva.com/28450/1489800-28450409.pdf?src-supplier=Element14, ComponentLink7Description=https://datasheet.ciiva.com/5789/1489800-5789558.pdf?src-supplier=Farnell, ComponentLink7URL=https://datasheet.ciiva.com/5789/1489800-5789558.pdf?src-supplier=Farnell, ComponentLink8Description=https://datasheet.ciiva.com/8033/1489800-8033630.pdf?src-supplier=Element14, ComponentLink8URL=https://datasheet.ciiva.com/8033/1489800-8033630.pdf?src-supplier=Element14, ComponentLink9Description=https://datasheet.ciiva.com/22745/1489800-22745767.pdf?src-supplier=Element14, ComponentLink9URL=https://datasheet.ciiva.com/22745/1489800-22745767.pdf?src-supplier=Element14, ComponentLink10Description=https://datasheet.ciiva.com/5425/upy-gphc-x7r-6-3v-to-50v-8-12304-5425518.pdf?src-supplier=Mouser, ComponentLink10URL=https://datasheet.ciiva.com/5425/upy-gphc-x7r-6-3v-to-50v-8-12304-5425518.pdf?src-supplier=Mouser, ComponentLink11Description=https://datasheet.ciiva.com/11586/upy-gphc-x7r-6-3v-to-50v-8-11586486.pdf?src-supplier=Avnet, ComponentLink11URL=https://datasheet.ciiva.com/11586/upy-gphc-x7r-6-3v-to-50v-8-11586486.pdf?src-supplier=Avnet, ComponentLink12Description=https://datasheet.ciiva.com/15189/getdatasheetpartid-315557-15189133.pdf?src-supplier=Verical, ComponentLink12URL=https://datasheet.ciiva.com/15189/getdatasheetpartid-315557-15189133.pdf?src-supplier=Verical, Depth=0.5mm, Halogen Free="Halogen Free", Height=0.5mm, Item Type=Capacitor, Lead Free="Lead Free", Length=1mm, Manufacturer Part Number=CC0402KRX7R9BB332, Mount="Surface Mount", Number of Pins=2, Packaging="Tape and Reel", Pricing 1="10000=0.00230, 40000=0.00200, 50000=0.00220, 150000=0.00190, 250000=0.00200, 400000=0.00180, 1000000=0.00190, 2500000=0.00180 (USD)", Radiation Hardening=No, Reach SVHC Compliant=Yes, RoHS=Yes, RoHS Compliant=Yes, Series=CC, Stock 1=1190000, Supplier 1="Future Electronics", Terminal Length=0.225mm, Termination=SMD/SMT, Thickness=0.022inch, Voltage Rating=50V, Voltage Rating (DC)=50V, Width=0.02inch
C19 C20 C21: library part 885012205080, "CAP CER 1000PF 100V X7R 0402", LCSC Part Number=C2176546, Manufacturer="Wurth Electronics", Supplier Part Number 1=732-12243-1-ND, ComponentLink1Description=https://katalog.we-online.de/pbs/datasheet/885012205080.pdf?src-supplier=Digi-Key, ComponentLink1URL=https://katalog.we-online.de/pbs/datasheet/885012205080.pdf?src-supplier=Digi-Key, Manufacturer Part Number=885012205080, Pricing 1="1=0.10000, 10=0.01900, 100=0.01730, 500=0.01532 (USD)", RoHS=Yes, Stock 1=13604, Supplier 1=Digi-Key
C23 C24: library part CC0402MRX5R6BB106, "CAP CER 10UF 10V X5R 0402", Case Code (Imperial)=0402, Case Code (Metric)=1005, LCSC Part Number=C962143, Manufacturer=Yageo, Max Operating Temperature=85°C, Min Operating Temperature=-55°C, Supplier Part Number 1=6097631, Tolerance=20%, Voltage Rating=10V, Capacitance=10uF, Case/Package=0402, Category="Ceramic Capacitors", ComponentLink1Description=http://www.yageo.com/documents/recent/UPY-GPHC_X5R_4V-to-50V_25.pdf?src-supplier=Digi-Key, ComponentLink1URL=http://www.yageo.com/documents/recent/UPY-GPHC_X5R_4V-to-50V_25.pdf?src-supplier=Digi-Key, Item Type=Capacitor, Manufacturer Part Number=CC0402MRX5R6BB106, Mount="Surface Mount", Packaging="Tape and Reel", Pricing 1="10000=0.02650, 20000=0.02590, 30000=0.02550, 40000=0.02530, 50000=0.02450 (USD)", RoHS=Yes, RoHS Compliant=Yes, Stock 1=80000, Supplier 1="Future Electronics"
D1 D2 D3: "DIODE GEN PURP 75V 150MA SOD323", Average Rectified Current=150mA, Capacitance=2pF, Forward Current=300mA, Forward Voltage=1.25V, LCSC Part Number=C60580, Manufacturer=Diodes, Max Forward Surge Current (Ifsm)=2A, Max Operating Temperature=150°C, Max Repetitive Reverse Voltage (Vrrm)=75V, Max Reverse Current=1uA, Min Operating Temperature=-65°C, Package Quantity=3000, Power Dissipation=200mW, Supplier Part Number 1=621-1N4148WS-F, Category="Rectifier Diodes", ComponentLink1Description=https://datasheet.ciiva.com/1179/ds30097-1179355.pdf?src-supplier=Element14, ComponentLink1URL=https://datasheet.ciiva.com/1179/ds30097-1179355.pdf?src-supplier=Element14, ComponentLink2Description=https://datasheet.ciiva.com/8300/ds30097-8300396.pdf?src-supplier=Avnet, ComponentLink2URL=https://datasheet.ciiva.com/8300/ds30097-8300396.pdf?src-supplier=Avnet, ComponentLink3Description=https://datasheet.ciiva.com/16199/ds30097-16199061.pdf?src-supplier=Future+Electronics, ComponentLink3URL=https://datasheet.ciiva.com/16199/ds30097-16199061.pdf?src-supplier=Future+Electronics, ComponentLink4Description=https://datasheet.ciiva.com/911/ds30097-911742.pdf?src-supplier=Digi-Key, ComponentLink4URL=https://datasheet.ciiva.com/911/ds30097-911742.pdf?src-supplier=Digi-Key, ComponentLink5Description=https://datasheet.ciiva.com/911/ds30097-911743.pdf?src-supplier=Digi-Key, ComponentLink5URL=https://datasheet.ciiva.com/911/ds30097-911743.pdf?src-supplier=Digi-Key, ComponentLink6Description=https://datasheet.ciiva.com/911/ds30097-911741.pdf?src-supplier=Digi-Key, ComponentLink6URL=https://datasheet.ciiva.com/911/ds30097-911741.pdf?src-supplier=Digi-Key, Contact Plating=Tin,Matte, Current Rating=150mA, Element Configuration=Single, Height=1mm, Lead Free="Lead Free", Length=1.8mm, Manufacturer Part Number=1N4148WS-7-F, Max Reverse Voltage (DC)=75V, Max Surge Current=2A, Mount="Surface Mount", Number of Pins=2, Output Current=150mA, Packaging="Tape and Reel", Peak Non-Repetitive Surge Current=2A, Polarity=Standard, Power Rating=200mW, Pricing 1="1=0.19000, 10=0.17500, 50=0.17500, 100=0.09600, 500=0.05900, 1000=0.04000, 3000=0.03000, 9000=0.02600, 10000=0.02600, 24000=0.02300, 45000=0.01900 (USD)", Radiation Hardening=No, REACH SVHC="No SVHC", Recovery Time=4ns, Reverse Recovery Time=4ns, Reverse Recovery Time-Max=4ns, RoHS=Yes, RoHS Compliant=Yes, Series=-, Supplier 1=Mouser, Voltage=75V, Voltage Rating (DC)=75V, Weight=0.000173oz, Width=1.4mm
J1: library part B-2100S04P-A110, "Straight 2.54mm 6mm -40℃~+105℃ 3mm 4 2.54mm 单排 Black Brass 1x4P Plugin,P=2.54mm Pin Headers ROHS", LCSC Part Number=C124378, Manufacturer=Ckmtw, Item Type=Header, Manufacturer Part Number=B-2100S04P-A110
J2: library part B-2100S03P-A110, "Straight 2.54mm Black Brass 1x3P Plugin,P=2.54mm Pin Headers ROHS", LCSC Part Number=C124376, Manufacturer=Ckmtw, Item Type=Header, Manufacturer Part Number=B-2100S03P-A110
L1: library part SLF7045T-220MR90-PF, "FIXED IND 22UH 1.34A 73.2MOHM SM", Case/Package=Nonstandard, Current Rating=1.34A, DC Resistance (DCR)=61mR, Inductance Tolerance=20%, LCSC Part Number=C13754, Manufacturer=TDK, Max DC Current=900mA, Max Operating Temperature=85°C, Min Operating Temperature=-40°C, Package Quantity=1, Resistor Type=Wirewound, Supplier Part Number 1=9164248, Test Frequency=100kHz, Category="Fixed Inductors", ComponentLink1Description=https://datasheet.ciiva.com/3866/84print-detail-pdf-phplangenpart-noslf7045t-220mr90-pfnreimp-unit-x-3866590.pdf?src-supplier=Arrow+Electronics, ComponentLink1URL=https://datasheet.ciiva.com/3866/84print-detail-pdf-phplangenpart-noslf7045t-220mr90-pfnreimp-unit-x-3866590.pdf?src-supplier=Arrow+Electronics, Core Material=Ferrite, DC Current=1.34A, Depth=7.2mm, Height=4.5mm, Height - Seated (Max)=0.189inch, Inductance=22uH, Item Type=Inductor, Lead Free="Lead Free", Length=0.276inch, Manufacturer Part Number=SLF7045T-220MR90-PF, Military Standard=Not, Mount="Surface Mount", Packaging="Tape and Reel", Pricing 1="10=0.64900, 100=0.61900, 500=0.49700, 1000=0.34500, 2500=0.32500 (GBP)", Radiation Hardening=No, Rated Current-Max=900mA, Reach SVHC Compliant=Yes, RMS Current (Irms)=1.34A, RoHS=Yes, RoHS Compliant=Yes, Saturation Current=900mA, Series=SLF, Shielding=Shielded, Stock 1=650, Supplier 1=RSComponents, Termination=SMD/SMT, Tolerance=20%, Width=0.276inch
LED1 LED2: library part 16-213/GHC-YR1S1/3T, "Green 520~535nm 0402 Light Emitting Diodes (LED) RoHS", LCSC Part Number=C74338, Manufacturer="Everlight Elec", Package=0402, ComponentLink1Description=LCSC, ComponentLink1URL=https://www.lcsc.com/product-detail/Light-Emitting-Diodes-LED_Everlight-Elec-16-213-GHC-YR1S1-3T_C74338.html, Dominant Wavelength / Coordinate rank=520~535nm, Illumination Color=Green, Luminous Intensity (IF=20mA)=112~285mcd, Manufacturer Part Number=16-213/GHC-YR1S1/3T, Mounting Type="Surface Mount"
P1 P2 P3 P4 P5: "Wire Connecting Pad"
P6: "CONN HEADER 6 POS 2.54", Color=Black, Current Rating=3A, Manufacturer="Wurth Electronics", Max Operating Temperature=125°C, Min Operating Temperature=-40°C, Supplier Part Number 1=20X0957, Voltage Rating=250V, Category="Headers and Wire Housings", ComponentLink1Description=http://www.mouser.com/ds/2/445/6130xx11121-538006.pdf?src-supplier=Mouser, ComponentLink1URL=http://www.mouser.com/ds/2/445/6130xx11121-538006.pdf?src-supplier=Mouser, ComponentLink2Description=http://www.farnell.com/cad/1737268.pdf?src-supplier=Element14, ComponentLink2URL=http://www.farnell.com/cad/1737268.pdf?src-supplier=Element14, ComponentLink3Description=https://katalog.we-online.de/em/datasheet/6130xx11121.pdf?src-supplier=Digi-Key, ComponentLink3URL=https://katalog.we-online.de/em/datasheet/6130xx11121.pdf?src-supplier=Digi-Key, Connector Type="Male Pin", Contact Gender=Male, Contact Material="Copper Alloy,Copper", Contact Mating Length=0.236inch, Contact Plating=Gold, Contact Type="Male Pin", Gender=Male, Housing Material=PBT, Lead Free="Lead Free", Manufacturer Part Number=61300611121, Mount="Through Hole", Number of Contacts=6, Number of Positions=6, Number of Rows=1, Packaging=Bulk, Pitch=0.1inch, Pricing 1="1=0.34000, 10=0.28900, 25=0.24000, 50=0.20100, 100=0.18200 (USD)", REACH SVHC=Unknown, RoHS=Yes, RoHS Compliant=Yes, Series=WR-PHD, Stock 1=4996, Supplier 1=Newark, Termination="Through Hole"
P7 P8 P9 P10 P11 P12 P13 P14 P15 P16: "Test Point ON"
P17: "CONN HEADER VERT 2POS 2.54MM", Color=Black, Current Rating=3A, Manufacturer="Wurth Electronics", Max Operating Temperature=125°C, Min Operating Temperature=-40°C, Supplier Part Number 1=732-5315-ND, Voltage Rating=250V, ComponentLink1Description=http://www.mouser.com/ds/2/445/6130xx11121-538006.pdf?src-supplier=Mouser, ComponentLink1URL=http://www.mouser.com/ds/2/445/6130xx11121-538006.pdf?src-supplier=Mouser, Connector Type="Male Pin", Contact Gender=Male, Contact Material="Copper Alloy,Copper", Contact Mating Length=0.236inch, Contact Plating=Gold, Gender=Male, Housing Material=PBT, Lead Free="Lead Free", Manufacturer Part Number=61300211121, Mount="Through Hole", Number of Contacts=2, Number of Positions=2, Number of Rows=1, Packaging=Bulk, Pitch=0.1inch, Pricing 1="1=0.13, 10=0.106, 25=0.088, 50=0.074, 100=0.067, 1000=0.061 (USD)", REACH SVHC=Unknown, Stock 1=219205, Supplier 1=Digi-Key, Termination="Through Hole"
Q1 Q2 Q3 Q4 Q5 Q6: "MOSFET N-CH 60V 100A SUPERSO8", LCSC Part Number=C501503, Manufacturer=Infineon, Manufacturer Part Number=BSC0702LSATMA1, Supplier Part Number 1=448-BSC0702LSATMA1CT-ND, Category=MOSFETs, ComponentLink1Description=LCSC, ComponentLink1URL=https://www.lcsc.com/product-detail/MOSFETs_Infineon-Technologies-BSC0702LS_C501503.html, Item Type=Transistor, Pricing 1="1=1.88000, 10=1.69000, 100=1.35800, 500=1.11572, 1000=0.92978 (USD)", RoHS=No, Stock 1=9380, Supplier 1=Digi-Key
R1: library part CRGH0603J100K, "RES SMD 100K OHM 5% 1/5W 0603", Case Code (Imperial)=0603, Case Code (Metric)=1608, LCSC Part Number=C2074142, Manufacturer="TE Connectivity", Max Operating Temperature=125°C, Min Operating Temperature=-55°C, Number of Resistors=1, Power Rating=200mW, Resistance=100kR, Resistance Tolerance=5%, Resistor Type="Thick Film,Power resistor", Supplier Part Number 1=A126393DKR-ND, Temperature Coefficient=100ppm/°C, Voltage Rating=50V, Case/Package=0603, ComponentLink1Description=http://www.farnell.com/datasheets/2007183.pdf?src-supplier=Element14, ComponentLink1URL=http://www.farnell.com/datasheets/2007183.pdf?src-supplier=Element14, Depth=0.8mm, ELV=Compliant, Height=0.45mm, Length=1.6mm, Manufacturer Part Number=CRGH0603J100K, Mount="Surface Mount", Number of Terminations=2, Packaging="Tape and Reel", Pricing 1="1=0.1, 10=0.049, 100=0.02, 1000=0.00899, 2500=0.0078 (USD)", REACH SVHC="No SVHC", RoHS Compliant=Yes, Series=CRGH, Stock 1=23277, Supplier 1=Digi-Key, Technology="THICK FILM", Termination=Solder, Tolerance=5%, Voltage Rating (DC)=50V, Width=0.8mm
R2: library part RC0603FR-07120RL, "RES 120 OHM 1% 1/10W 0603", Case Code (Imperial)=0603, Case Code (Metric)=1608, LCSC Part Number=C114640, Manufacturer=Yageo, Max Operating Temperature=155°C, Max Power Dissipation=100mW, Min Operating Temperature=-55°C, Package Quantity=1, Resistance Tolerance=1%, Resistor Type="Thick Film", Supplier Part Number 1=311-120HRCT-ND, Temperature Coefficient=100ppm/°C, Voltage Rating=50V, Case/Package=0603, Category="Chip SMD Resistors", ComponentLink1Description=https://datasheet.ciiva.com/2553/pyu-r-int-thick-7-2553512.pdf?src-supplier=Digi-Key, ComponentLink1URL=https://datasheet.ciiva.com/2553/pyu-r-int-thick-7-2553512.pdf?src-supplier=Digi-Key, ComponentLink2Description=https://datasheet.ciiva.com/7746/443971-7746248.pdf?src-supplier=Element14, ComponentLink2URL=https://datasheet.ciiva.com/7746/443971-7746248.pdf?src-supplier=Element14, ComponentLink3Description=https://datasheet.ciiva.com/2553/pyu-r-int-thick-7-2553513.pdf?src-supplier=Digi-Key, ComponentLink3URL=https://datasheet.ciiva.com/2553/pyu-r-int-thick-7-2553513.pdf?src-supplier=Digi-Key, ComponentLink4Description=https://datasheet.ciiva.com/7746/443971-7746249.pdf?src-supplier=Element14, ComponentLink4URL=https://datasheet.ciiva.com/7746/443971-7746249.pdf?src-supplier=Element14, ComponentLink5Description=https://datasheet.ciiva.com/2553/pyu-r-int-thick-7-2553514.pdf?src-supplier=Digi-Key, ComponentLink5URL=https://datasheet.ciiva.com/2553/pyu-r-int-thick-7-2553514.pdf?src-supplier=Digi-Key, ComponentLink6Description=https://datasheet.ciiva.com/46395/443971-46395021.pdf?src-supplier=Element14, ComponentLink6URL=https://datasheet.ciiva.com/46395/443971-46395021.pdf?src-supplier=Element14, Construction=Rectangular, Depth=0.8mm, Features="Moisture Resistant", Height=0.022inch, Lead Free="Lead Free", Length=1.6mm, Manufacturer Part Number=RC0603FR-07120RL, Military Standard=Not, Number of Pins=2, Number of Terminations=2, Packaging="Tape and Reel", Power Rating=100mW, Pricing 1="1=0.10000, 10=0.02400, 100=0.00970, 1000=0.00436, 2500=0.00378 (USD)", REACH SVHC="No SVHC", Resistance=120R, RoHS=Yes, RoHS Compliant=Yes, Series=RC, Size Code=0603, Stock 1=839061, Supplier 1=Digi-Key, Termination=SMD/SMT, Tolerance=1%, Voltage Rating (DC)=50V, Width=0.031inch
R3 R4 R5: library part RC0402FR-071RL, "RES 1 OHM 1% 1/16W 0402", Case Code (Imperial)=0402, Case Code (Metric)=1005, LCSC Part Number=C185446, Manufacturer=Yageo, Max Operating Temperature=155°C, Max Power Dissipation=63mW, Min Operating Temperature=-55°C, Power Rating=62.5mW, Resistance Tolerance=1%, Resistor Type="Thick Film", Supplier Part Number 1=603-RC0402FR-071RL, Temperature Coefficient=200ppm/°C, Voltage Rating=50V, Case/Package=0402, Category="Chip SMD Resistors", ComponentLink1Description=https://datasheet.ciiva.com/11808/0900766b80c66297-11808794.pdf?src-supplier=RSComponents, ComponentLink1URL=https://datasheet.ciiva.com/11808/0900766b80c66297-11808794.pdf?src-supplier=RSComponents, ComponentLink2Description=https://datasheet.ciiva.com/7849/1018594-7849895.pdf?src-supplier=Element14, ComponentLink2URL=https://datasheet.ciiva.com/7849/1018594-7849895.pdf?src-supplier=Element14, ComponentLink3Description=https://datasheet.ciiva.com/7849/1018594-7849894.pdf?src-supplier=Element14, ComponentLink3URL=https://datasheet.ciiva.com/7849/1018594-7849894.pdf?src-supplier=Element14, ComponentLink4Description=https://datasheet.ciiva.com/46394/1018594-46394952.pdf?src-supplier=Element14, ComponentLink4URL=https://datasheet.ciiva.com/46394/1018594-46394952.pdf?src-supplier=Element14, ComponentLink5Description=https://datasheet.ciiva.com/12667/pyu-rc0402-51-rohs-l-6-r-12667915.pdf?src-supplier=Mouser, ComponentLink5URL=https://datasheet.ciiva.com/12667/pyu-rc0402-51-rohs-l-6-r-12667915.pdf?src-supplier=Mouser, ComponentLink6Description=https://datasheet.ciiva.com/16740/pyu-rc0402-51-rohs-l-6-r-16740903.pdf?src-supplier=Future+Electronics, ComponentLink6URL=https://datasheet.ciiva.com/16740/pyu-rc0402-51-rohs-l-6-r-16740903.pdf?src-supplier=Future+Electronics, Construction=Rectangular, Depth=0.5mm, Features="Moisture Resistant", Height=0.32mm, Lead Free="Lead Free", Length=1mm, Manufacturer Part Number=RC0402FR-071RL, Military Standard=Not, Number of Terminations=2, Packaging="Tape and Reel", Pricing 1="1=0.10000, 10=0.02200, 50=0.02200, 100=0.00900, 1000=0.00400, 10000=0.00200 (USD)", REACH SVHC="No SVHC", Resistance=1R, RoHS=Yes, RoHS Compliant=Yes, Series=RC, Stock 1=239284, Supplier 1=Mouser, Technology="THICK FILM", Termination=SMD/SMT, Tolerance=1%, Voltage Rating (DC)=50V, Working Voltage=50V
R6 R7 R8 R18 R19 R20: library part RC0402FR-07100RL, "RES 100 OHM 1% 1/16W 0402", Case Code (Imperial)=0402, Case Code (Metric)=1005, LCSC Part Number=C106232, Manufacturer=Yageo, Max Operating Temperature=155°C, Max Power Dissipation=63mW, Min Operating Temperature=-55°C, Power Rating=62.5mW, Resistance Tolerance=1%, Resistor Type="Thick Film", Supplier Part Number 1=603-RC0402FR-07100RL, Temperature Coefficient=100ppm/°C, Voltage Rating=50V, Case/Package=0402, Category="Chip SMD Resistors", ComponentLink1Description=https://datasheet.ciiva.com/11808/0900766b80c66297-11808765.pdf?src-supplier=RSComponents, ComponentLink1URL=https://datasheet.ciiva.com/11808/0900766b80c66297-11808765.pdf?src-supplier=RSComponents, ComponentLink2Description=https://datasheet.ciiva.com/7849/1784430-7849810.pdf?src-supplier=Element14, ComponentLink2URL=https://datasheet.ciiva.com/7849/1784430-7849810.pdf?src-supplier=Element14, ComponentLink3Description=https://datasheet.ciiva.com/28367/1018594-28367226.pdf?src-supplier=Element14, ComponentLink3URL=https://datasheet.ciiva.com/28367/1018594-28367226.pdf?src-supplier=Element14, ComponentLink4Description=https://datasheet.ciiva.com/22747/1018594-22747511.pdf?src-supplier=Element14, ComponentLink4URL=https://datasheet.ciiva.com/22747/1018594-22747511.pdf?src-supplier=Element14, ComponentLink5Description=https://datasheet.ciiva.com/12667/pyu-rc0402-51-rohs-l-6-r-12667957.pdf?src-supplier=Mouser, ComponentLink5URL=https://datasheet.ciiva.com/12667/pyu-rc0402-51-rohs-l-6-r-12667957.pdf?src-supplier=Mouser, ComponentLink6Description=https://datasheet.ciiva.com/15189/getdatasheetpartid-329466-15189335.pdf?src-supplier=Verical, ComponentLink6URL=https://datasheet.ciiva.com/15189/getdatasheetpartid-329466-15189335.pdf?src-supplier=Verical, ComponentLink7Description=https://datasheet.ciiva.com/16740/pyu-rc0402-51-rohs-l-6-r-16740566.pdf?src-supplier=Future+Electronics, ComponentLink7URL=https://datasheet.ciiva.com/16740/pyu-rc0402-51-rohs-l-6-r-16740566.pdf?src-supplier=Future+Electronics, Construction=Rectangular, Depth=0.5mm, Features="Moisture Resistant", Height=0.32mm, Lead Free="Lead Free", Length=1mm, Manufacturer Part Number=RC0402FR-07100RL, Military Standard=Not, Number of Pins=2, Number of Terminations=2, Packaging="Tape and Reel", Pricing 1="1=0.10000, 10=0.01200, 50=0.01200, 100=0.00500, 1000=0.00300, 2500=0.00200, 10000=0.00100 (USD)", REACH SVHC="No SVHC", Resistance=100R, RoHS=Yes, RoHS Compliant=Yes, Series=RC, Size Code=0402, Stock 1=699545, Supplier 1=Mouser, Technology="THICK FILM", Termination=SMD/SMT, Tolerance=1%, Voltage Rating (DC)=50V, Width=0.5mm
R9 R11 R16: library part RC0402FR-07100KL, "RES 100K OHM 1% 1/16W 0402", Case Code (Imperial)=0402, Case Code (Metric)=1005, LCSC Part Number=C60491, Manufacturer=Yageo, Max Operating Temperature=155°C, Max Power Dissipation=63mW, Min Operating Temperature=-55°C, Package Quantity=1, Resistance=100kR, Resistance Tolerance=1%, Resistor Type="Thick Film", Supplier Part Number 1=603-RC0402FR-07100KL, Temperature Coefficient=100ppm/°C, Voltage Rating=50V, Case/Package=0402, Category="Chip SMD Resistors", ComponentLink1Description=https://datasheet.ciiva.com/11819/0900766b80c66297-11819452.pdf?src-supplier=RSComponents, ComponentLink1URL=https://datasheet.ciiva.com/11819/0900766b80c66297-11819452.pdf?src-supplier=RSComponents, ComponentLink2Description=https://datasheet.ciiva.com/22747/1018594-22747509.pdf?src-supplier=Element14, ComponentLink2URL=https://datasheet.ciiva.com/22747/1018594-22747509.pdf?src-supplier=Element14, ComponentLink3Description=https://datasheet.ciiva.com/2453/pyu-r-int-thick-7-2453362.pdf?src-supplier=Digi-Key, ComponentLink3URL=https://datasheet.ciiva.com/2453/pyu-r-int-thick-7-2453362.pdf?src-supplier=Digi-Key, ComponentLink4Description=https://datasheet.ciiva.com/2453/pyu-r-int-thick-7-2453363.pdf?src-supplier=Digi-Key, ComponentLink4URL=https://datasheet.ciiva.com/2453/pyu-r-int-thick-7-2453363.pdf?src-supplier=Digi-Key, ComponentLink5Description=https://datasheet.ciiva.com/2453/pyu-r-int-thick-7-2453361.pdf?src-supplier=Digi-Key, ComponentLink5URL=https://datasheet.ciiva.com/2453/pyu-r-int-thick-7-2453361.pdf?src-supplier=Digi-Key, ComponentLink6Description=https://datasheet.ciiva.com/12667/pyu-rc0402-51-rohs-l-6-r-12667930.pdf?src-supplier=Mouser, ComponentLink6URL=https://datasheet.ciiva.com/12667/pyu-rc0402-51-rohs-l-6-r-12667930.pdf?src-supplier=Mouser, ComponentLink7Description=https://datasheet.ciiva.com/15189/getdatasheetpartid-323696-15189334.pdf?src-supplier=Verical, ComponentLink7URL=https://datasheet.ciiva.com/15189/getdatasheetpartid-323696-15189334.pdf?src-supplier=Verical, Construction=Rectangular, Depth=0.5mm, Features="Moisture Resistant", Height=0.016inch, Item Type=Resistor, Lead Free="Lead Free", Length=0.039inch, Manufacturer Part Number=RC0402FR-07100KL, Military Standard=Not, Number of Terminations=2, Packaging="Tape and Reel", Power Rating=63mW, Pricing 1="1=0.10000, 10=0.01200, 50=0.01200, 100=0.00500, 1000=0.00300, 2500=0.00200, 10000=0.00100 (USD)", REACH SVHC="No SVHC", RoHS=Yes, RoHS Compliant=Yes, Series=RC, Stock 1=7759549, Supplier 1=Mouser, Technology="THICK FILM", Termination=SMD/SMT, Tolerance=1%, Width=0.02inch, Working Voltage=50V
R10 R12 R17: library part AR03BTCX4301, "RES 4.3K OHM 0.1% 1/10W 0603", LCSC Part Number=C2828647, Manufacturer="Viking Tech", Package=0603, ComponentLink1Description=LCSC, ComponentLink1URL=https://www.lcsc.com/product-detail/Chip-Resistor-Surface-Mount_Viking-Tech-AR03BTCX4301_C2828647.html, Item Type=Resistor, Manufacturer Part Number=AR03BTCX4301
R13 R14 R15: library part PA2512FKF7T0R002E, "Res 2512 0.002 Ohm 1% 3W ±100ppm/C Epoxy Pad SMD Automotive T/R", Case/Package=2512, LCSC Part Number=C728320, Manufacturer=Yageo, Max Operating Temperature=170°C, Max Power Dissipation=3W, Min Operating Temperature=-55°C, Package Quantity=4000, Resistance=2mR, Resistor Type="Thin Film", Supplier Part Number 1=603-PA2512FKF7T0R002, Temperature Coefficient=100ppm/°C, Tolerance=1%, Category="Chip SMD Resistors", ComponentLink1Description=http://www.mouser.com/ds/2/447/PYu-PA_E_51_RoHS_5-1077983.pdf?src-supplier=Mouser, ComponentLink1URL=http://www.mouser.com/ds/2/447/PYu-PA_E_51_RoHS_5-1077983.pdf?src-supplier=Mouser, ComponentLink2Description=http://www.yageo.com/documents/recent/PYu-PA_E_51_RoHS_7.pdf?src-supplier=Digi-Key, ComponentLink2URL=http://www.yageo.com/documents/recent/PYu-PA_E_51_RoHS_7.pdf?src-supplier=Digi-Key, Features="Moisture Resistant,Automotive AEC-Q200", Height=0.035inch, Item Type=Resistor, Length=0.25inch, Manufacturer Part Number=PA2512FKF7T0R002E, Number of Terminations=2, Packaging="Tape and Reel", Pricing 1="1=0.78000, 10=0.67800, 50=0.52800, 100=0.45900, 1000=0.29400, 10000=0.29400 (USD)", RoHS=Yes, RoHS Compliant=Yes, Stock 1=5437, Supplier 1=Mouser, Width=0.125inch
R21: library part RT0603DRD07200KL, "RES SMD 200K OHM 0.5% 1/10W 0603", Case Code (Imperial)=0603, Case Code (Metric)=1608, LCSC Part Number=C136943, Manufacturer=Yageo, Max Operating Temperature=125°C, Min Operating Temperature=-55°C, Power Rating=100mW, Resistance=200kR, Supplier Part Number 1=311-200KDCT-ND, Temperature Coefficient=25ppm/°C, Tolerance=0.5%, Voltage Rating=75V, Voltage Rating (DC)=50V, Case/Package=0603, Lead Free="Lead Free", Manufacturer Part Number=RT0603DRD07200KL, Packaging="Tape and Reel", Pricing 1="1=0.21, 10=0.174, 100=0.0682, 1000=0.02855, 2500=0.02617 (USD)", Stock 1=88258, Supplier 1=Digi-Key, Termination=SMD/SMT